# Altium PCB PCB1.PcbDoc (part 3 of 5)
Units mm, origin at the board's own origin, x right, y up, seen from the top; angles counter-clockwise.
Board outline 50 x 70 mm, 6 copper layers (Top Layer, L2, L3, L4, L5, Bottom Layer), stack 1.232 mm thick; 119 components, 75 nets, 612 pads, 243 vias.
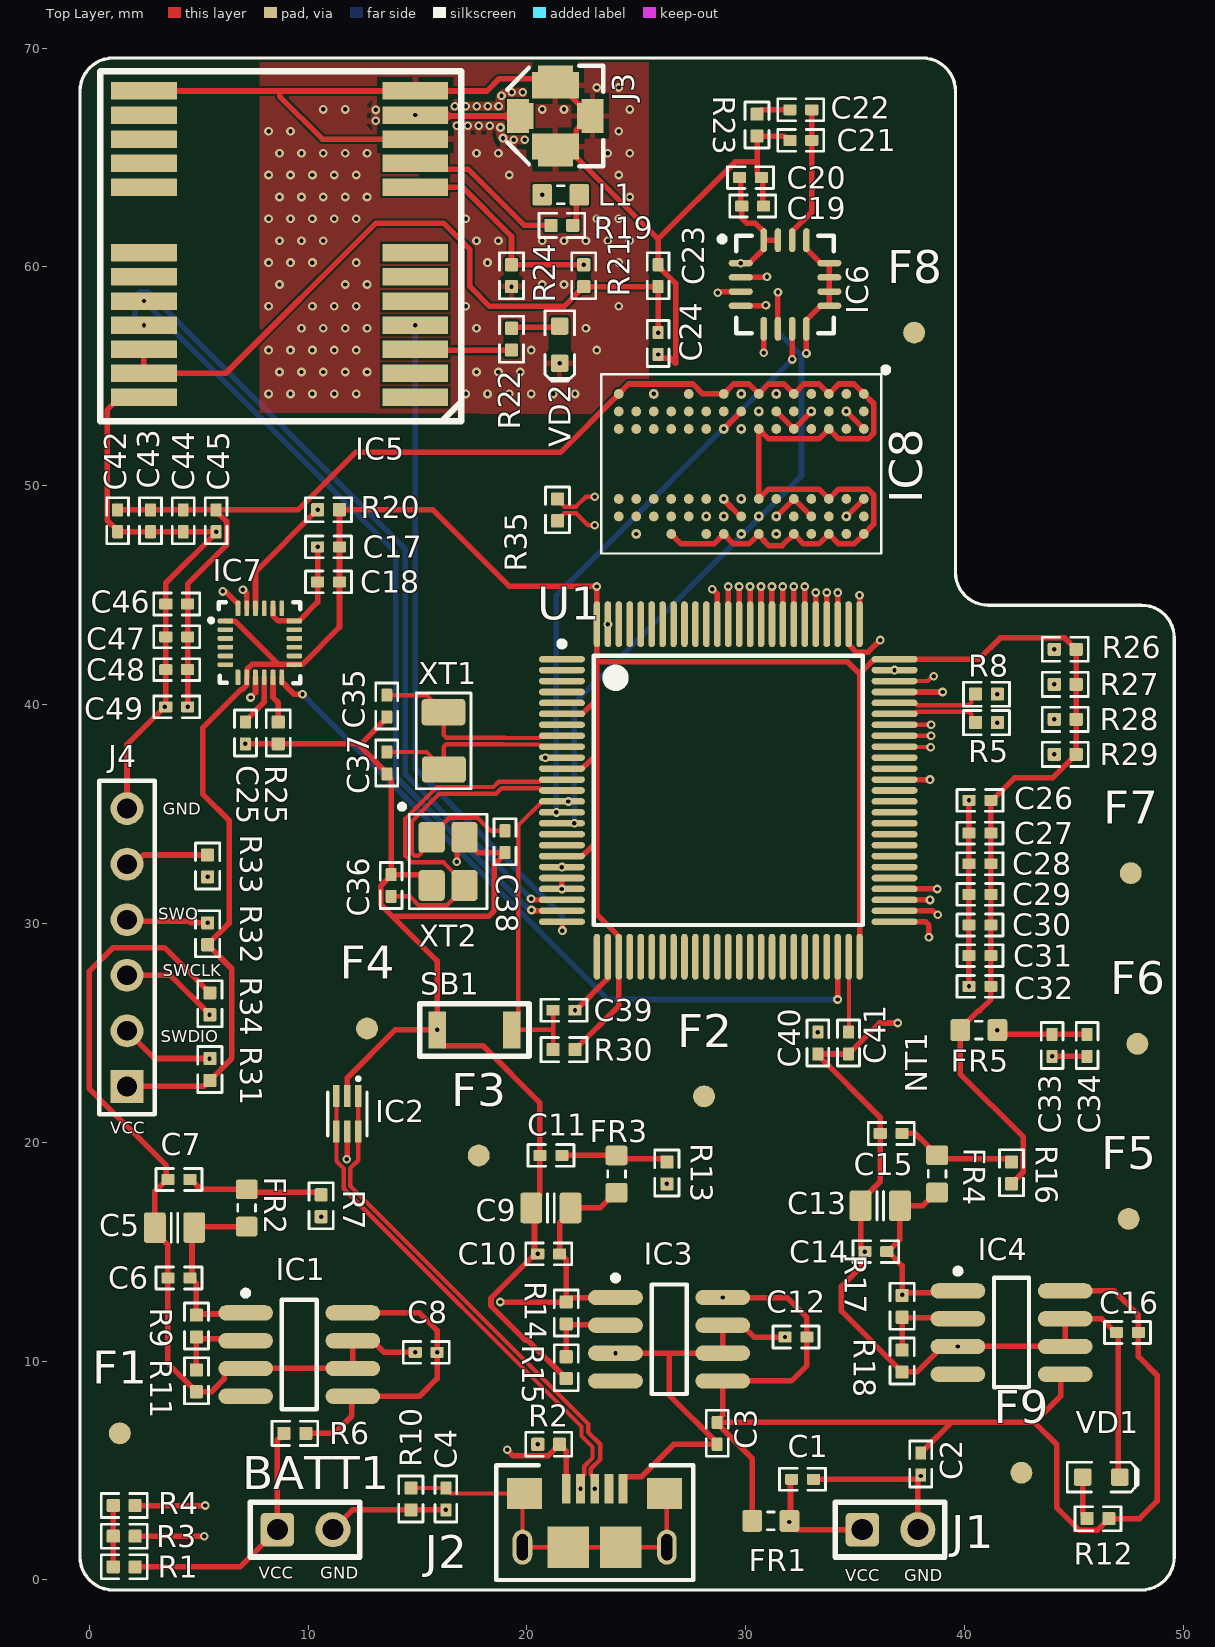
[diagram p0: Top Layer view]

## Part data (continued)
J3: library part RF_IF_connector, "RF COAX CONN, MCX JACK, 50 OHM; Available until stocks are exhausted Alternative available", Frequency=6GHz, Manufacturer=Molex, Manufacturer Lifecycle Status=ACTIVE, Manufacturer Part Number=73412-0114, Max Operating Temperature=90°C, Min Operating Temperature=-40°C, Voltage Rating=60V, Category="RF / Coaxial Connectors", China RoHS=Compliant, ComponentLink1Description=https://datasheet.octopart.com:443/73412-0114-Molex-datasheet-180780342.pdf?src-supplier=IHS, ComponentLink1URL=https://datasheet.octopart.com:443/73412-0114-Molex-datasheet-180780342.pdf?src-supplier=IHS, ComponentLink2Description=https://sigma.octopart.com:443/138898246/technical_drawing/Molex-73412-0114.pdf?src-supplier=Upverter, ComponentLink2URL=https://sigma.octopart.com:443/138898246/technical_drawing/Molex-73412-0114.pdf?src-supplier=Upverter, ComponentLink3Description=https://datasheet.octopart.com:443/73412-0114-Molex-datasheet-138898245.pdf?src-supplier=Upverter, ComponentLink3URL=https://datasheet.octopart.com:443/73412-0114-Molex-datasheet-138898245.pdf?src-supplier=Upverter, ComponentLink4Description=https://datasheet.octopart.com:443/73412-0114-Molex-datasheet-10850749.pdf?src-supplier=Sager+Electronics, ComponentLink4URL=https://datasheet.octopart.com:443/73412-0114-Molex-datasheet-10850749.pdf?src-supplier=Sager+Electronics, ComponentLink5Description=https://datasheet.octopart.com:443/73412-0114-Molex-datasheet-12565081.pdf?src-supplier=Molex, ComponentLink5URL=https://datasheet.octopart.com:443/73412-0114-Molex-datasheet-12565081.pdf?src-supplier=Molex, ComponentLink6Description=https://datasheet.octopart.com:443/73412-0114-Molex-datasheet-10635824.pdf?src-supplier=Molex, ComponentLink6URL=https://datasheet.octopart.com:443/73412-0114-Molex-datasheet-10635824.pdf?src-supplier=Molex, ComponentLink7Description=https://datasheet.octopart.com:443/73412-0114-Molex-datasheet-193131178.pdf?src-supplier=JRH+Electronics, ComponentLink7URL=https://datasheet.octopart.com:443/73412-0114-Molex-datasheet-193131178.pdf?src-supplier=JRH+Electronics, ComponentLink8Description=https://datasheet.octopart.com:443/73412-0114-Molex-datasheet-154758341.pdf?src-supplier=Master+Electronics, ComponentLink8URL=https://datasheet.octopart.com:443/73412-0114-Molex-datasheet-154758341.pdf?src-supplier=Master+Electronics, ComponentLink9Description=https://datasheet.octopart.com:443/73412-0114-Molex-datasheet-48881632.pdf?src-supplier=Electro+Sonic, ComponentLink9URL=https://datasheet.octopart.com:443/73412-0114-Molex-datasheet-48881632.pdf?src-supplier=Electro+Sonic, ComponentLink10Description=https://datasheet.octopart.com:443/73412-0114-Molex-datasheet-140187865.pdf?src-supplier=RS+(Formerly+Allied+Electronics), ComponentLink10URL=https://datasheet.octopart.com:443/73412-0114-Molex-datasheet-140187865.pdf?src-supplier=RS+(Formerly+Allied+Electronics), ComponentLink11Description=https://datasheet.octopart.com:443/73412-0114-Molex-datasheet-120156197.pdf?src-supplier=RS+(Formerly+Allied+Electronics), ComponentLink11URL=https://datasheet.octopart.com:443/73412-0114-Molex-datasheet-120156197.pdf?src-supplier=RS+(Formerly+Allied+Electronics), ComponentLink12Description=https://datasheet.octopart.com:443/73412-0114-Molex-datasheet-34442373.pdf?src-supplier=RS+(Formerly+Allied+Electronics), ComponentLink12URL=https://datasheet.octopart.com:443/73412-0114-Molex-datasheet-34442373.pdf?src-supplier=RS+(Formerly+Allied+Electronics), ComponentLink13Description=https://datasheet.octopart.com:443/73412-0114-Molex-datasheet-101583681.pdf?src-supplier=Newark, ComponentLink13URL=https://datasheet.octopart.com:443/73412-0114-Molex-datasheet-101583681.pdf?src-supplier=Newark, ComponentLink14Description=https://datasheet.octopart.com:443/73412-0114-Molex-datasheet-33004215.pdf?src-supplier=Newark, ComponentLink14URL=https://datasheet.octopart.com:443/73412-0114-Molex-datasheet-33004215.pdf?src-supplier=Newark, ComponentLink15Description=https://datasheet.octopart.com:443/73412-0114-Molex-datasheet-45012700.pdf?src-supplier=TME, ComponentLink15URL=https://datasheet.octopart.com:443/73412-0114-Molex-datasheet-45012700.pdf?src-supplier=TME, ComponentLink16Description=https://datasheet.octopart.com:443/0734120114-Molex-datasheet-11806901.pdf?src-supplier=Arrow+Electronics, ComponentLink16URL=https://datasheet.octopart.com:443/0734120114-Molex-datasheet-11806901.pdf?src-supplier=Arrow+Electronics, ComponentLink17Description=http://sigma.octopart.com:80/16441451/rohs_statement/Molex-73412-0114.pdf?src-supplier=Compliance+Statements, ComponentLink17URL=http://sigma.octopart.com:80/16441451/rohs_statement/Molex-73412-0114.pdf?src-supplier=Compliance+Statements, ComponentLink18Description=http://sigma.octopart.com:80/reach_statement/Molex-company-74.pdf?src-supplier=Compliance+Statements, ComponentLink18URL=http://sigma.octopart.com:80/reach_statement/Molex-company-74.pdf?src-supplier=Compliance+Statements, ComponentLink19Description=http://sigma.octopart.com:80/rohs_statement/Molex-company-73.pdf?src-supplier=Compliance+Statements, ComponentLink19URL=http://sigma.octopart.com:80/rohs_statement/Molex-company-73.pdf?src-supplier=Compliance+Statements, ComponentLink20Description=http://sigma.octopart.com:80/conflict_mineral_statement/Molex-company-72.pdf?src-supplier=Compliance+Statements, ComponentLink20URL=http://sigma.octopart.com:80/conflict_mineral_statement/Molex-company-72.pdf?src-supplier=Compliance+Statements, Connector Type=Coaxial, Contact Material="Gold, Nickel", Contact Plating=Gold, Country of Origin=TW, Fastening Type=Snap, Gender=Female, Halogen Free="Low Halogen", Height=1.36mm, Impedance=50Ω, Lifecycle Status=Production, Mounting Technology="Surface Mount", Number of Contacts=1, Orientation=Straight, Packaging="Cut Tape", Polarity=Standard, Pricing="10=0.677, 100=0.547, 500=0.505, 1000=0.432 (EUR)", Radiation Hardening=No, REACH SVHC=Yes, RoHS=Compliant, Schedule B="8536694010, 8536694010|8536694010|8536694010|8536694010|8536694010|8536694010|8536694010|8536694010|8536694010|8536694010|8536694010|8536694010|8536694010|8536694010|8536694010|8536694010|8536694010|8536694010|8536694010|8536694010|8536694010|8536694010|8536694010|85", Stock=3848, Supplier=Farnell, Supplier Part Number=73412-0114, Termination=Solder, Weight=69.994973mg
J4: library part Header6P, "Pin Header, Board-to-Board, 2.54 mm, 1 Rows, 6 Contacts, Through Hole, FCI BergStik II 68000", Color=-, Current Rating=3A, Flammability Rating="UL94 V-0", Housing Color=Black, Insulation Resistance=5GΩ, Manufacturer="Sullins Connector Solutions", Manufacturer Part Number=68000-406HLF, Manufacturer Part Number 1=GRPB061VWVN-RC, Max Operating Temperature=130°C, Max Voltage Rating (AC)=1.5kV, Min Operating Temperature=-65°C, Supplier Part Number=609-3263-ND, Supplier Part Number 1=S9014E-06-ND, Category="Connectors, Interconnects", China RoHS=Compliant, ComponentLink1Description=https://datasheet.octopart.com:443/68000-406HLF-Areva-datasheet-10088795.pdf?src-supplier=Farnell, ComponentLink1URL=https://datasheet.octopart.com:443/68000-406HLF-Areva-datasheet-10088795.pdf?src-supplier=Farnell, ComponentLink2Description=https://datasheet.octopart.com:443/68000-406HLF-Areva-datasheet-8861575.pdf?src-supplier=Farnell, ComponentLink2URL=https://datasheet.octopart.com:443/68000-406HLF-Areva-datasheet-8861575.pdf?src-supplier=Farnell, ComponentLink3Description=https://datasheet.octopart.com:443/68000-406HLF-Amphenol-Communications-Solutions-datasheet-151206381.pdf?src-supplier=Farnell, ComponentLink3URL=https://datasheet.octopart.com:443/68000-406HLF-Amphenol-Communications-Solutions-datasheet-151206381.pdf?src-supplier=Farnell, ComponentLink4Description=https://datasheet.octopart.com:443/68000-406HLF-Areva-datasheet-8713716.pdf?src-supplier=Farnell, ComponentLink4URL=https://datasheet.octopart.com:443/68000-406HLF-Areva-datasheet-8713716.pdf?src-supplier=Farnell, ComponentLink5Description=https://datasheet.octopart.com:443/68000-406HLF-Areva-datasheet-8449737.pdf?src-supplier=Farnell, ComponentLink5URL=https://datasheet.octopart.com:443/68000-406HLF-Areva-datasheet-8449737.pdf?src-supplier=Farnell, ComponentLink6Description=https://datasheet.octopart.com:443/68000-406HLF-Amphenol-Communications-Solutions-datasheet-41232361.pdf?src-supplier=Newark, ComponentLink6URL=https://datasheet.octopart.com:443/68000-406HLF-Amphenol-Communications-Solutions-datasheet-41232361.pdf?src-supplier=Newark, ComponentLink7Description=https://datasheet.octopart.com:443/68000-406HLF-Amphenol-Communications-Solutions-datasheet-154727322.pdf?src-supplier=Electro+Sonic, ComponentLink7URL=https://datasheet.octopart.com:443/68000-406HLF-Amphenol-Communications-Solutions-datasheet-154727322.pdf?src-supplier=Electro+Sonic, ComponentLink8Description=https://datasheet.octopart.com:443/68000-406HLF-Amphenol-Communications-Solutions-datasheet-168215121.pdf?src-supplier=TME, ComponentLink8URL=https://datasheet.octopart.com:443/68000-406HLF-Amphenol-Communications-Solutions-datasheet-168215121.pdf?src-supplier=TME, ComponentLink9Description=https://datasheet.octopart.com:443/68000-406HLF-Amphenol-Communications-Solutions-datasheet-100449246.pdf?src-supplier=Future+Electronics, ComponentLink9URL=https://datasheet.octopart.com:443/68000-406HLF-Amphenol-Communications-Solutions-datasheet-100449246.pdf?src-supplier=Future+Electronics, ComponentLink10Description=https://datasheet.octopart.com:443/68000-406HLF-Amphenol-Communications-Solutions-datasheet-13703433.pdf?src-supplier=RS+(Formerly+Allied+Electronics), ComponentLink10URL=https://datasheet.octopart.com:443/68000-406HLF-Amphenol-Communications-Solutions-datasheet-13703433.pdf?src-supplier=RS+(Formerly+Allied+Electronics), Connector Type="Header, Unshrouded", Contact Finish=Gold, Contact Finish Thickness=Flash, Contact Gender=Male, Contact Material="Nickel, Tin", Contact Mating Length="0.118\" (3.00mm)", Contact Plating=Tin, Contact Type="Male Pin", Depth=2.41mm, Fastening Type=-, Features=-, Gender=Male, Height=8.7mm, Housing Material=Thermoplastic, Lead Length=2.41mm, Length=15.24mm, Lifecycle Status=Production, Mating Post Length=5.84mm, Mounting Technology="Through Hole", Mounting Type="Through Hole", Number of Contacts=6, Number of Positions=6, Number of Positions Loaded=All, Number of Rows=1, Orientation=Straight, Packaging=Bulk, Pins=6, Pitch="0.050\" (1.27mm)", Pricing="1=0.29, 10=0.247, 100=0.2099, 500=0.18728, 1000=0.17833, 5000=0.15917, 10000=0.15157 (USD)", Radiation Hardening=No, REACH SVHC=Yes, RoHS="RoHS Compliant", Row Spacing=-, Stock=13192, Supplier=DigiKey, Supplier 1=Digi-Key, Terminal Pitch=2.54mm, Termination=Solder, Voltage Rating=1.5kV
L1: library part Inductor, "Inductor RF Chip Wirewound 0.027uH 2% 250MHz 35Q-Factor Ceramic 0.6A 0.22Ohm DCR 0603 T/R", Case/Package=0603, DC Current=600mA, DC Resistance (DCR)=220mΩ, Manufacturer="Yageo Group", Manufacturer Part Number=PE-0603CD270GTT, Max Operating Temperature=125°C, Min Operating Temperature=-40°C, Self Resonant Frequency=2.8GHz, Supplier Part Number=673-PE-0603CD270GTT, Test Frequency=250MHz, Tolerance=2%, Category="Fixed Inductors", ComponentLink1Description=https://datasheet.octopart.com:443/PE-0603CD270GTT-Pulse-datasheet-181143408.pdf?src-supplier=IHS, ComponentLink1URL=https://datasheet.octopart.com:443/PE-0603CD270GTT-Pulse-datasheet-181143408.pdf?src-supplier=IHS, ComponentLink2Description=https://datasheet.octopart.com:443/PE-0603CD270GTT-Pulse-datasheet-138830387.pdf?src-supplier=Master+Electronics, ComponentLink2URL=https://datasheet.octopart.com:443/PE-0603CD270GTT-Pulse-datasheet-138830387.pdf?src-supplier=Master+Electronics, ComponentLink3Description=https://datasheet.octopart.com:443/PE-0603CD270GTT-Pulse-datasheet-134530799.pdf?src-supplier=Sager+Electronics, ComponentLink3URL=https://datasheet.octopart.com:443/PE-0603CD270GTT-Pulse-datasheet-134530799.pdf?src-supplier=Sager+Electronics, ComponentLink4Description=https://datasheet.octopart.com:443/PE-0603CD270GTT-Pulse-datasheet-137333523.pdf?src-supplier=Sager+Electronics, ComponentLink4URL=https://datasheet.octopart.com:443/PE-0603CD270GTT-Pulse-datasheet-137333523.pdf?src-supplier=Sager+Electronics, ComponentLink5Description=https://datasheet.octopart.com:443/PE-0603CD270GTT-Pulse-datasheet-11546668.pdf?src-supplier=_legacy+Avnet, ComponentLink5URL=https://datasheet.octopart.com:443/PE-0603CD270GTT-Pulse-datasheet-11546668.pdf?src-supplier=_legacy+Avnet, ComponentLink6Description=https://datasheet.octopart.com:443/PE-0603CD270GTT-Pulse-datasheet-118874.pdf?src-supplier=Component+Distributors+Inc., ComponentLink6URL=https://datasheet.octopart.com:443/PE-0603CD270GTT-Pulse-datasheet-118874.pdf?src-supplier=Component+Distributors+Inc., Core Material=Ceramic, Depth=1.24mm, Height=1.02mm, Length=1.8mm, Lifecycle Status=Production, Max Current Rating=600mA, Max DC Current=600mA, Military Standard=Not, Number of Circuits=1, Number of Terminals=2, Packaging="Tape & Reel", Pricing="1=0.34, 10=0.276, 50=0.276, 100=0.227, 1000=0.173, 10000=0.165 (USD)", Q Factor=35, Radiation Hardening=No, REACH SVHC=Yes, RoHS=Compliant, Schedule B="8504500000, 8504500000|8504500000, 8504500000|8504500000|8504500000, 8504500000|8504500000|8504500000|8504500000", Shielding=Unshielded, Stock=10862, Supplier=Mouser, Termination=SMD/SMT, Weight=2.012816mg, Width=1.24mm
R1 R2 R3 R4 R6 R7 R13 R16 R24 R25 R33: library part Res, "GENERAL PURPOSE CHIP RESISTOR Metal Glaze/thick Film, 0.0625W, 0ohm, Surface Mount, 0402", Case Code (Imperial)=0402, Manufacturer="Yageo Group", Manufacturer Part Number=RC0402JR-070RL, Max Operating Temperature=155°C, Max Power Dissipation=63mW, Min Operating Temperature=-55°C, Power Rating=62.5mW, Temperature Coefficient=200ppm/°C, Tolerance=5%, Voltage Rating=50V, Case/Package=0402, Category="Chip SMD Resistors", China RoHS=Non-Compliant, ComponentLink1Description=https://datasheet.octopart.com:443/RC0402JR-070RL-Yageo-datasheet-182189538.pdf?src-supplier=IHS, ComponentLink1URL=https://datasheet.octopart.com:443/RC0402JR-070RL-Yageo-datasheet-182189538.pdf?src-supplier=IHS, ComponentLink2Description=https://datasheet.octopart.com:443/RC0402JR-070RL-Yageo-datasheet-10408619.pdf?src-supplier=Newark, ComponentLink2URL=https://datasheet.octopart.com:443/RC0402JR-070RL-Yageo-datasheet-10408619.pdf?src-supplier=Newark, ComponentLink3Description=https://datasheet.octopart.com:443/RC0402JR-070RL-Yageo-Group-datasheet-181964826.pdf?src-supplier=Newark, ComponentLink3URL=https://datasheet.octopart.com:443/RC0402JR-070RL-Yageo-Group-datasheet-181964826.pdf?src-supplier=Newark, ComponentLink4Description=https://datasheet.octopart.com:443/RC0402JR-070RL-Yageo-Group-datasheet-190305687.pdf?src-supplier=Future+Electronics, ComponentLink4URL=https://datasheet.octopart.com:443/RC0402JR-070RL-Yageo-Group-datasheet-190305687.pdf?src-supplier=Future+Electronics, ComponentLink5Description=https://datasheet.octopart.com:443/RC0402JR-070RL-Yageo-datasheet-164759695.pdf?src-supplier=Future+Electronics, ComponentLink5URL=https://datasheet.octopart.com:443/RC0402JR-070RL-Yageo-datasheet-164759695.pdf?src-supplier=Future+Electronics, ComponentLink6Description=https://datasheet.octopart.com:443/RC0402JR-070RL-Yageo-datasheet-137700087.pdf?src-supplier=Future+Electronics, ComponentLink6URL=https://datasheet.octopart.com:443/RC0402JR-070RL-Yageo-datasheet-137700087.pdf?src-supplier=Future+Electronics, ComponentLink7Description=https://datasheet.octopart.com:443/RC0402JR-070RL-Yageo-datasheet-12531192.pdf?src-supplier=Seeed+Studio, ComponentLink7URL=https://datasheet.octopart.com:443/RC0402JR-070RL-Yageo-datasheet-12531192.pdf?src-supplier=Seeed+Studio, ComponentLink8Description=https://datasheet.octopart.com:443/RC0402JR-070RL-Yageo-datasheet-8324527.pdf?src-supplier=TME, ComponentLink8URL=https://datasheet.octopart.com:443/RC0402JR-070RL-Yageo-datasheet-8324527.pdf?src-supplier=TME, ComponentLink9Description=https://datasheet.octopart.com:443/RC0402JR-070RL-Yageo-datasheet-62067350.pdf?src-supplier=Farnell, ComponentLink9URL=https://datasheet.octopart.com:443/RC0402JR-070RL-Yageo-datasheet-62067350.pdf?src-supplier=Farnell, ComponentLink10Description=https://datasheet.octopart.com:443/RC0402JR-070RL-Yageo-datasheet-8329306.pdf?src-supplier=element14, ComponentLink10URL=https://datasheet.octopart.com:443/RC0402JR-070RL-Yageo-datasheet-8329306.pdf?src-supplier=element14, ComponentLink11Description=https://datasheet.octopart.com:443/RC0402JR-070RL-Yageo-datasheet-505231.pdf?src-supplier=element14, ComponentLink11URL=https://datasheet.octopart.com:443/RC0402JR-070RL-Yageo-datasheet-505231.pdf?src-supplier=element14, ComponentLink12Description=https://datasheet.octopart.com:443/RC0402JR-070RL-Yageo-datasheet-175423674.pdf?src-supplier=SOS+electronic, ComponentLink12URL=https://datasheet.octopart.com:443/RC0402JR-070RL-Yageo-datasheet-175423674.pdf?src-supplier=SOS+electronic, ComponentLink13Description=https://datasheet.octopart.com/RC0402JR-070RL-Yageo-datasheet-73766026.pdf, ComponentLink13URL=https://datasheet.octopart.com/RC0402JR-070RL-Yageo-datasheet-73766026.pdf, ComponentLink14Description=http://sigma.octopart.com:80/conflict_mineral_statement/Yageo-company-3.pdf?src-supplier=Compliance+Statements, ComponentLink14URL=http://sigma.octopart.com:80/conflict_mineral_statement/Yageo-company-3.pdf?src-supplier=Compliance+Statements, ComponentLink15Description=http://sigma.octopart.com:80/rohs_statement/Yageo-company-2.pdf?src-supplier=Compliance+Statements, ComponentLink15URL=http://sigma.octopart.com:80/rohs_statement/Yageo-company-2.pdf?src-supplier=Compliance+Statements, Composition="Thick Film", Contact Plating=Tin, Depth=500µm, Features="Moisture Resistant", Height=350µm, Lead Free="Lead Free", Length=1mm, Lifecycle Status=Production, Military Standard=Not, Mounting Technology="Surface Mount", Number of Terminals=2, Number of Terminations=2, Packaging="Tape & Reel", Pins=2, Pricing="10000=0.0011 (USD)", Radiation Hardening=No, REACH SVHC=Yes, RoHS=Compliant, Schedule B="8533290000, 8533290000|8533290000, 8533290000|8533290000|8533290000, 8533290000|8533290000|8533290000|8533290000", Stock=53900000, Supplier="Arrow Electronics", Supplier Part Number=RC0402JR-070RL, Termination=SMD/SMT, Voltage Rating (DC)=50V, Width=500µm
R5 R8: library part Res, "62.5mW Thick Film Resistors 50V ±100ppm/℃ ±5% 22Ω 0402 Chip Resistor - Surface Mount ROHS", Case Code (Imperial)=0402, Manufacturer="Yageo Group", Manufacturer Part Number=RC0402JR-0722RL, Max Operating Temperature=155°C, Max Power Dissipation=63mW, Min Operating Temperature=-55°C, Power Rating=62.5mW, Temperature Coefficient=100ppm/°C, Tolerance=5%, Voltage Rating=50V, Case/Package=0402, Category="Chip SMD Resistors", China RoHS=Non-Compliant, ComponentLink1Description=https://datasheet.octopart.com:443/RC0402JR-0722RL-Yageo-datasheet-175887523.pdf?src-supplier=IHS, ComponentLink1URL=https://datasheet.octopart.com:443/RC0402JR-0722RL-Yageo-datasheet-175887523.pdf?src-supplier=IHS, ComponentLink2Description=https://datasheet.octopart.com:443/RC0402JR-0722RL-Yageo-datasheet-141265859.pdf?src-supplier=Upverter, ComponentLink2URL=https://datasheet.octopart.com:443/RC0402JR-0722RL-Yageo-datasheet-141265859.pdf?src-supplier=Upverter, ComponentLink3Description=https://sigma.octopart.com:443/138820526/technical_drawing/Yageo-RC0402JR-0722RL.pdf?src-supplier=Upverter, ComponentLink3URL=https://sigma.octopart.com:443/138820526/technical_drawing/Yageo-RC0402JR-0722RL.pdf?src-supplier=Upverter, ComponentLink4Description=https://datasheet.octopart.com:443/RC0402JR-0722RL-Yageo-Group-datasheet-190305687.pdf?src-supplier=Future+Electronics, ComponentLink4URL=https://datasheet.octopart.com:443/RC0402JR-0722RL-Yageo-Group-datasheet-190305687.pdf?src-supplier=Future+Electronics, ComponentLink5Description=https://datasheet.octopart.com:443/RC0402JR-0722RL-Yageo-datasheet-164759695.pdf?src-supplier=Future+Electronics, ComponentLink5URL=https://datasheet.octopart.com:443/RC0402JR-0722RL-Yageo-datasheet-164759695.pdf?src-supplier=Future+Electronics, ComponentLink6Description=https://datasheet.octopart.com:443/RC0402JR-0722RL-Yageo-datasheet-137700087.pdf?src-supplier=Future+Electronics, ComponentLink6URL=https://datasheet.octopart.com:443/RC0402JR-0722RL-Yageo-datasheet-137700087.pdf?src-supplier=Future+Electronics, ComponentLink7Description=https://datasheet.octopart.com:443/RC0402JR-0722RL-Yageo-datasheet-12531192.pdf?src-supplier=Future+Electronics, ComponentLink7URL=https://datasheet.octopart.com:443/RC0402JR-0722RL-Yageo-datasheet-12531192.pdf?src-supplier=Future+Electronics, ComponentLink8Description=https://datasheet.octopart.com:443/RC0402JR-0722RL-Yageo-datasheet-505231.pdf?src-supplier=Future+Electronics, ComponentLink8URL=https://datasheet.octopart.com:443/RC0402JR-0722RL-Yageo-datasheet-505231.pdf?src-supplier=Future+Electronics, ComponentLink9Description=https://datasheet.octopart.com:443/RC0402JR-0722RL-Yageo-datasheet-10408619.pdf?src-supplier=Newark, ComponentLink9URL=https://datasheet.octopart.com:443/RC0402JR-0722RL-Yageo-datasheet-10408619.pdf?src-supplier=Newark, ComponentLink10Description=https://datasheet.octopart.com:443/RC0402JR-0722RL-Yageo-datasheet-8324527.pdf?src-supplier=Newark, ComponentLink10URL=https://datasheet.octopart.com:443/RC0402JR-0722RL-Yageo-datasheet-8324527.pdf?src-supplier=Newark, ComponentLink11Description=https://datasheet.octopart.com:443/RC0402JR-0722RL-Yageo-datasheet-62067350.pdf?src-supplier=element14+APAC, ComponentLink11URL=https://datasheet.octopart.com:443/RC0402JR-0722RL-Yageo-datasheet-62067350.pdf?src-supplier=element14+APAC, ComponentLink12Description=https://datasheet.octopart.com/RC0402JR-0722RL-Yageo-datasheet-73766026.pdf, ComponentLink12URL=https://datasheet.octopart.com/RC0402JR-0722RL-Yageo-datasheet-73766026.pdf, ComponentLink13Description=https://datasheet.octopart.com:443/RC0402JR-0722RL-Yageo-datasheet-8329306.pdf?src-supplier=element14, ComponentLink13URL=https://datasheet.octopart.com:443/RC0402JR-0722RL-Yageo-datasheet-8329306.pdf?src-supplier=element14, ComponentLink14Description=http://sigma.octopart.com:80/conflict_mineral_statement/Yageo-company-3.pdf?src-supplier=Compliance+Statements, ComponentLink14URL=http://sigma.octopart.com:80/conflict_mineral_statement/Yageo-company-3.pdf?src-supplier=Compliance+Statements, ComponentLink15Description=http://sigma.octopart.com:80/rohs_statement/Yageo-company-2.pdf?src-supplier=Compliance+Statements, ComponentLink15URL=http://sigma.octopart.com:80/rohs_statement/Yageo-company-2.pdf?src-supplier=Compliance+Statements, Composition="Thick Film", Country of Origin="Mainland China, Taiwan", Depth=500µm, Export Control Classification Number (ECCN) Code=EAR99, Features="Moisture Resistant", Harmonized Tariff Schedule (HTS) Code=8533.21.00.30, Height=350µm, Introduction Date=2008-07-18, Lead Free="Lead Free", Length=1mm, Lifecycle Status=Production, Military Standard=Not, Mounting Technology="Surface Mount", Number of Terminals=2, Number of Terminations=2, Packaging="Tape & Reel", Pins=2, Pricing="10=0.0052, 100=0.0043, 500=0.0032, 2500=0.0021, 5000=0.002 (EUR)", REACH SVHC=Yes, RoHS=Compliant, Schedule B="8533210045, 8533210045|8533210045, 8533210045|8533210045|8533210045, 8533210045|8533210045|8533210045|8533210045", Stock=890, Supplier=Farnell, Supplier Part Number=RC0402JR-0722RL, Termination=SMD/SMT, Voltage Rating (AC)=50V, Voltage Rating (DC)=50V, Width=500µm, Working Voltage=50V
R9: library part Res, "Res Thick Film 0402 4.75K Ohm 1% 0.063W ±100ppm/°C Molded SMD Paper T/R", Case Code (Imperial)=0402, Case Code (Metric)=1005, Manufacturer="Stackpole Electronics", Manufacturer Part Number=RMCF0402FT4K75, Max Operating Temperature=155°C, Max Power Dissipation=63mW, Min Operating Temperature=-55°C, Ratings=AEC-Q200, Temperature Coefficient=100ppm/°C, Tolerance=1%, Voltage Rating=50V, Case/Package=0402, Category="Chip SMD Resistors", China RoHS=Non-Compliant, ComponentLink1Description=https://datasheet.octopart.com:443/RMCF0402FT4K75-Stackpole-Electronics-datasheet-182148065.pdf?src-supplier=IHS, ComponentLink1URL=https://datasheet.octopart.com:443/RMCF0402FT4K75-Stackpole-Electronics-datasheet-182148065.pdf?src-supplier=IHS, ComponentLink2Description=https://datasheet.octopart.com:443/RMCF0402FT4K75-Stackpole-Electronics-datasheet-141193804.pdf?src-supplier=Upverter, ComponentLink2URL=https://datasheet.octopart.com:443/RMCF0402FT4K75-Stackpole-Electronics-datasheet-141193804.pdf?src-supplier=Upverter, ComponentLink3Description=https://datasheet.octopart.com:443/RMCF0402FT4K75-Stackpole-Electronics-datasheet-62091608.pdf?src-supplier=Upverter, ComponentLink3URL=https://datasheet.octopart.com:443/RMCF0402FT4K75-Stackpole-Electronics-datasheet-62091608.pdf?src-supplier=Upverter, ComponentLink4Description=https://datasheet.octopart.com:443/RMCF0402FT4K75-Stackpole-Electronics-datasheet-28504820.pdf?src-supplier=Master+Electronics, ComponentLink4URL=https://datasheet.octopart.com:443/RMCF0402FT4K75-Stackpole-Electronics-datasheet-28504820.pdf?src-supplier=Master+Electronics, ComponentLink5Description=https://datasheet.octopart.com:443/RMCF0402FT4K75-Stackpole-Electronics-datasheet-12534581.pdf?src-supplier=Stackpole+Electronics, ComponentLink5URL=https://datasheet.octopart.com:443/RMCF0402FT4K75-Stackpole-Electronics-datasheet-12534581.pdf?src-supplier=Stackpole+Electronics, ComponentLink6Description=https://datasheet.octopart.com:443/RMCF0402FT4K75-Stackpole-Electronics-datasheet-10788263.pdf?src-supplier=Stackpole+Electronics, ComponentLink6URL=https://datasheet.octopart.com:443/RMCF0402FT4K75-Stackpole-Electronics-datasheet-10788263.pdf?src-supplier=Stackpole+Electronics, ComponentLink7Description=https://datasheet.octopart.com:443/RMCF0402FT4K75-Stackpole-Electronics-datasheet-154799224.pdf?src-supplier=JRH+Electronics, ComponentLink7URL=https://datasheet.octopart.com:443/RMCF0402FT4K75-Stackpole-Electronics-datasheet-154799224.pdf?src-supplier=JRH+Electronics, ComponentLink8Description=https://datasheet.octopart.com:443/RMCF0402FT4K75-Stackpole-Electronics-datasheet-11546843.pdf?src-supplier=Arrow+Electronics, ComponentLink8URL=https://datasheet.octopart.com:443/RMCF0402FT4K75-Stackpole-Electronics-datasheet-11546843.pdf?src-supplier=Arrow+Electronics, ComponentLink9Description=http://sigma.octopart.com:80/15940719/materials_sheet/Stackpole-Electronics-RMCF0402FT4K75.pdf?src-supplier=Compliance+Statements, ComponentLink9URL=http://sigma.octopart.com:80/15940719/materials_sheet/Stackpole-Electronics-RMCF0402FT4K75.pdf?src-supplier=Compliance+Statements, ComponentLink10Description=http://sigma.octopart.com:80/141158211/reach_statement/Stackpole-Electronics-RMCF0402FT4K75.pdf?src-supplier=Compliance+Statements, ComponentLink10URL=http://sigma.octopart.com:80/141158211/reach_statement/Stackpole-Electronics-RMCF0402FT4K75.pdf?src-supplier=Compliance+Statements, ComponentLink11Description=http://sigma.octopart.com:80/141158212/rohs_statement/Stackpole-Electronics-RMCF0402FT4K75.pdf?src-supplier=Compliance+Statements, ComponentLink11URL=http://sigma.octopart.com:80/141158212/rohs_statement/Stackpole-Electronics-RMCF0402FT4K75.pdf?src-supplier=Compliance+Statements, Composition="Thick Film", Contact Plating=Tin, Depth=500µm, Features="Automotive AEC-Q200", Height=300µm, Lead Free="Lead Free", Length=1mm, Lifecycle Status=Production, Military Standard=Not, Mounting Technology="Surface Mount", Number of Terminals=2, Number of Terminations=2, Packaging="Cut Tape (CT)", Power Rating=63mW, Pricing="5=0.0018 (USD)", Radiation Hardening=No, REACH SVHC=Yes, RoHS=Compliant, Schedule B="8533210045, 8533210045|8533210045, 8533210045|8533210045|8533210045, 8533210045|8533210045|8533210045|8533210045", Stock=5, Supplier="Arrow Electronics", Supplier Part Number=RMCF0402FT4K75, Width=500µm, Working Voltage=50V
R10: library part Res, "Res Thick Film 0402 1M Ohm 1% 0.063W(1/16W) ±100ppm/C Pad SMD T/R Automotive AEC-Q200", Case Code (Imperial)=0402, Case Code (Metric)=1005, Manufacturer="Stackpole Electronics", Manufacturer Part Number=RMCF0402FT1M00, Max Operating Temperature=155°C, Max Power Dissipation=63mW, Min Operating Temperature=-55°C, Ratings=AEC-Q200, Temperature Coefficient=100ppm/°C, Tolerance=1%, Voltage Rating=50V, Case/Package=0402, Category="Chip SMD Resistors", China RoHS=Non-Compliant, ComponentLink1Description=https://datasheet.octopart.com:443/RMCF0402FT1M00-Stackpole-Electronics-datasheet-182148065.pdf?src-supplier=IHS, ComponentLink1URL=https://datasheet.octopart.com:443/RMCF0402FT1M00-Stackpole-Electronics-datasheet-182148065.pdf?src-supplier=IHS, ComponentLink2Description=https://datasheet.octopart.com:443/RMCF0402FT1M00-Stackpole-Electronics-datasheet-141193804.pdf?src-supplier=Upverter, ComponentLink2URL=https://datasheet.octopart.com:443/RMCF0402FT1M00-Stackpole-Electronics-datasheet-141193804.pdf?src-supplier=Upverter, ComponentLink3Description=https://datasheet.octopart.com:443/RMCF0402FT1M00-Stackpole-Electronics-datasheet-62091608.pdf?src-supplier=Upverter, ComponentLink3URL=https://datasheet.octopart.com:443/RMCF0402FT1M00-Stackpole-Electronics-datasheet-62091608.pdf?src-supplier=Upverter, ComponentLink4Description=https://datasheet.octopart.com:443/RMCF0402FT1M00-Stackpole-Electronics-datasheet-28504820.pdf?src-supplier=Master+Electronics, ComponentLink4URL=https://datasheet.octopart.com:443/RMCF0402FT1M00-Stackpole-Electronics-datasheet-28504820.pdf?src-supplier=Master+Electronics, ComponentLink5Description=https://datasheet.octopart.com:443/RMCF0402FT1M00-Stackpole-Electronics-datasheet-12534581.pdf?src-supplier=Stackpole+Electronics, ComponentLink5URL=https://datasheet.octopart.com:443/RMCF0402FT1M00-Stackpole-Electronics-datasheet-12534581.pdf?src-supplier=Stackpole+Electronics, ComponentLink6Description=https://datasheet.octopart.com:443/RMCF0402FT1M00-Stackpole-Electronics-datasheet-10788263.pdf?src-supplier=Stackpole+Electronics, ComponentLink6URL=https://datasheet.octopart.com:443/RMCF0402FT1M00-Stackpole-Electronics-datasheet-10788263.pdf?src-supplier=Stackpole+Electronics, ComponentLink7Description=https://datasheet.octopart.com:443/RMCF0402FT1M00-Stackpole-Electronics-datasheet-154799224.pdf?src-supplier=JRH+Electronics, ComponentLink7URL=https://datasheet.octopart.com:443/RMCF0402FT1M00-Stackpole-Electronics-datasheet-154799224.pdf?src-supplier=JRH+Electronics, ComponentLink8Description=https://datasheet.octopart.com:443/RMCF0402FT1M00-Stackpole-Electronics-datasheet-12510902.pdf?src-supplier=Future+Electronics, ComponentLink8URL=https://datasheet.octopart.com:443/RMCF0402FT1M00-Stackpole-Electronics-datasheet-12510902.pdf?src-supplier=Future+Electronics, ComponentLink9Description=http://sigma.octopart.com:80/15940719/materials_sheet/Stackpole-Electronics-RMCF0402FT1M00.pdf?src-supplier=Compliance+Statements, ComponentLink9URL=http://sigma.octopart.com:80/15940719/materials_sheet/Stackpole-Electronics-RMCF0402FT1M00.pdf?src-supplier=Compliance+Statements, ComponentLink10Description=http://sigma.octopart.com:80/141158211/reach_statement/Stackpole-Electronics-RMCF0402FT1M00.pdf?src-supplier=Compliance+Statements, ComponentLink10URL=http://sigma.octopart.com:80/141158211/reach_statement/Stackpole-Electronics-RMCF0402FT1M00.pdf?src-supplier=Compliance+Statements, ComponentLink11Description=http://sigma.octopart.com:80/141158212/rohs_statement/Stackpole-Electronics-RMCF0402FT1M00.pdf?src-supplier=Compliance+Statements, ComponentLink11URL=http://sigma.octopart.com:80/141158212/rohs_statement/Stackpole-Electronics-RMCF0402FT1M00.pdf?src-supplier=Compliance+Statements, Composition="Thick Film", Contact Plating=Tin, Country of Origin="Japan, Mainland China, Taiwan", Depth=500µm, Export Control Classification Number (ECCN) Code=EAR99, Features="Automotive AEC-Q200", Harmonized Tariff Schedule (HTS) Code=8533.21.00.30, Height=300µm, Introduction Date=2011-01-07, Lead Free="Lead Free", Length=1mm, Lifecycle Status=Production, Military Standard=Not, Mounting Technology="Surface Mount", Number of Terminals=2, Number of Terminations=2, Packaging="Cut Tape (CT)", Power Rating=63mW, Pricing="60000=0.0016 (USD)", Radiation Hardening=No, REACH SVHC=Yes, RoHS=Compliant, Schedule B="8533210045, 8533210045|8533210045, 8533210045|8533210045|8533210045, 8533210045|8533210045|8533210045|8533210045", Stock=70000, Supplier="Arrow Electronics", Supplier Part Number=RMCF0402FT1M00, Width=500µm, Working Voltage=50V
R11 R14 R17 R20 R21 R23 R26 R27 R28 R29 R30 R31 R32 R34: library part Res, "Res Thick Film 0402 10K Ohm 1% 0.063W(1/16W) ±100ppm/C Pad SMD T/R Automotive AEC-Q200", Case Code (Imperial)=0402, Case Code (Metric)=1005, Manufacturer="Stackpole Electronics", Manufacturer Part Number=RMCF0402FT10K0, Max Operating Temperature=155°C, Max Power Dissipation=63mW, Min Operating Temperature=-55°C, Ratings=AEC-Q200, Temperature Coefficient=100ppm/°C, Tolerance=1%, Voltage Rating=50V, Case/Package=0402, Category="Chip SMD Resistors", China RoHS=Non-Compliant, ComponentLink1Description=https://datasheet.octopart.com:443/RMCF0402FT10K0-Stackpole-Electronics-datasheet-182148065.pdf?src-supplier=IHS, ComponentLink1URL=https://datasheet.octopart.com:443/RMCF0402FT10K0-Stackpole-Electronics-datasheet-182148065.pdf?src-supplier=IHS, ComponentLink2Description=https://datasheet.octopart.com:443/RMCF0402FT10K0-Stackpole-Electronics-datasheet-141193804.pdf?src-supplier=Upverter, ComponentLink2URL=https://datasheet.octopart.com:443/RMCF0402FT10K0-Stackpole-Electronics-datasheet-141193804.pdf?src-supplier=Upverter, ComponentLink3Description=https://datasheet.octopart.com:443/RMCF0402FT10K0-Stackpole-Electronics-datasheet-62091608.pdf?src-supplier=Upverter, ComponentLink3URL=https://datasheet.octopart.com:443/RMCF0402FT10K0-Stackpole-Electronics-datasheet-62091608.pdf?src-supplier=Upverter, ComponentLink4Description=https://datasheet.octopart.com:443/RMCF0402FT10K0-Stackpole-Electronics-datasheet-28504820.pdf?src-supplier=Upverter, ComponentLink4URL=https://datasheet.octopart.com:443/RMCF0402FT10K0-Stackpole-Electronics-datasheet-28504820.pdf?src-supplier=Upverter, ComponentLink5Description=https://datasheet.octopart.com:443/RMCF0402FT10K0-Stackpole-Electronics-datasheet-12534581.pdf?src-supplier=Stackpole+Electronics, ComponentLink5URL=https://datasheet.octopart.com:443/RMCF0402FT10K0-Stackpole-Electronics-datasheet-12534581.pdf?src-supplier=Stackpole+Electronics, ComponentLink6Description=https://datasheet.octopart.com:443/RMCF0402FT10K0-Stackpole-Electronics-datasheet-10788263.pdf?src-supplier=Stackpole+Electronics, ComponentLink6URL=https://datasheet.octopart.com:443/RMCF0402FT10K0-Stackpole-Electronics-datasheet-10788263.pdf?src-supplier=Stackpole+Electronics, ComponentLink7Description=https://datasheet.octopart.com:443/RMCF0402FT10K0-Stackpole-Electronics-datasheet-155966809.pdf?src-supplier=Electro+Sonic, ComponentLink7URL=https://datasheet.octopart.com:443/RMCF0402FT10K0-Stackpole-Electronics-datasheet-155966809.pdf?src-supplier=Electro+Sonic, ComponentLink8Description=https://datasheet.octopart.com:443/RMCF0402FT10K0-Stackpole-Electronics-datasheet-189104164.pdf?src-supplier=Master+Electronics, ComponentLink8URL=https://datasheet.octopart.com:443/RMCF0402FT10K0-Stackpole-Electronics-datasheet-189104164.pdf?src-supplier=Master+Electronics, ComponentLink9Description=https://datasheet.octopart.com:443/RMCF0402FT10K0-Stackpole-Electronics-datasheet-12510902.pdf?src-supplier=Master+Electronics, ComponentLink9URL=https://datasheet.octopart.com:443/RMCF0402FT10K0-Stackpole-Electronics-datasheet-12510902.pdf?src-supplier=Master+Electronics, ComponentLink10Description=https://datasheet.octopart.com:443/RMCF0402FT10K0-Stackpole-Electronics-datasheet-11546843.pdf?src-supplier=Arrow+Electronics, ComponentLink10URL=https://datasheet.octopart.com:443/RMCF0402FT10K0-Stackpole-Electronics-datasheet-11546843.pdf?src-supplier=Arrow+Electronics, ComponentLink11Description=https://datasheet.octopart.com:443/RMCF0402FT10K0-Stackpole-Electronics-datasheet-11547379.pdf?src-supplier=Future+Electronics, ComponentLink11URL=https://datasheet.octopart.com:443/RMCF0402FT10K0-Stackpole-Electronics-datasheet-11547379.pdf?src-supplier=Future+Electronics, ComponentLink12Description=https://datasheet.octopart.com:443/RMCF0402FT10K0-Stackpole-Electronics-datasheet-8359789.pdf?src-supplier=Future+Electronics, ComponentLink12URL=https://datasheet.octopart.com:443/RMCF0402FT10K0-Stackpole-Electronics-datasheet-8359789.pdf?src-supplier=Future+Electronics, ComponentLink13Description=https://datasheet.octopart.com:443/RMCF0402FT10K0-Stackpole-Electronics-datasheet-8324226.pdf?src-supplier=Future+Electronics, ComponentLink13URL=https://datasheet.octopart.com:443/RMCF0402FT10K0-Stackpole-Electronics-datasheet-8324226.pdf?src-supplier=Future+Electronics, ComponentLink14Description=http://sigma.octopart.com:80/15940719/materials_sheet/Stackpole-Electronics-RMCF0402FT10K0.pdf?src-supplier=Compliance+Statements, ComponentLink14URL=http://sigma.octopart.com:80/15940719/materials_sheet/Stackpole-Electronics-RMCF0402FT10K0.pdf?src-supplier=Compliance+Statements, ComponentLink15Description=http://sigma.octopart.com:80/141158211/reach_statement/Stackpole-Electronics-RMCF0402FT10K0.pdf?src-supplier=Compliance+Statements, ComponentLink15URL=http://sigma.octopart.com:80/141158211/reach_statement/Stackpole-Electronics-RMCF0402FT10K0.pdf?src-supplier=Compliance+Statements, ComponentLink16Description=http://sigma.octopart.com:80/141158212/rohs_statement/Stackpole-Electronics-RMCF0402FT10K0.pdf?src-supplier=Compliance+Statements, ComponentLink16URL=http://sigma.octopart.com:80/141158212/rohs_statement/Stackpole-Electronics-RMCF0402FT10K0.pdf?src-supplier=Compliance+Statements, Composition="Thick Film", Contact Plating=Tin, Country of Origin="Japan, Mainland China, Taiwan", Depth=500µm, Export Control Classification Number (ECCN) Code=EAR99, Features="Automotive AEC-Q200", Harmonized Tariff Schedule (HTS) Code=8533.21.00.30, Height=300µm, Introduction Date=2011-01-07, Lead Free="Lead Free", Length=1mm, Lifecycle Status=Production, Military Standard=Not, Mounting Technology="Surface Mount", Number of Terminals=2, Number of Terminations=2, Packaging="Cut Tape (CT)", Power Rating=63mW, Pricing="60000=0.0016, 100000=0.0015 (USD)", Radiation Hardening=No, REACH SVHC=Yes, RoHS=Compliant, Schedule B="8533210045, 8533210045|8533210045, 8533210045|8533210045|8533210045, 8533210045|8533210045|8533210045|8533210045", Stock=2060000, Supplier="Arrow Electronics", Supplier Part Number=RMCF0402FT10K0, Width=500µm, Working Voltage=50V
R12 R22: library part Res, "Res Thick Film 0402 1K Ohm 1% 0.063W(1/16W) ±100ppm/C Pad SMD Automotive T/R", Case Code (Imperial)=0402, Case Code (Metric)=1005, Manufacturer="Stackpole Electronics", Manufacturer Part Number=RMCF0402FT1K00, Max Operating Temperature=155°C, Max Power Dissipation=63mW, Min Operating Temperature=-55°C, Ratings=AEC-Q200, Temperature Coefficient=100ppm/°C, Tolerance=1%, Voltage Rating=50V, Case/Package=0402, Category="Chip SMD Resistors", China RoHS=Non-Compliant, ComponentLink1Description=https://datasheet.octopart.com:443/RMCF0402FT1K00-Stackpole-Electronics-datasheet-182148065.pdf?src-supplier=IHS, ComponentLink1URL=https://datasheet.octopart.com:443/RMCF0402FT1K00-Stackpole-Electronics-datasheet-182148065.pdf?src-supplier=IHS, ComponentLink2Description=https://datasheet.octopart.com:443/RMCF0402FT1K00-Stackpole-Electronics-datasheet-141193804.pdf?src-supplier=Upverter, ComponentLink2URL=https://datasheet.octopart.com:443/RMCF0402FT1K00-Stackpole-Electronics-datasheet-141193804.pdf?src-supplier=Upverter, ComponentLink3Description=https://datasheet.octopart.com:443/RMCF0402FT1K00-Stackpole-Electronics-datasheet-62091608.pdf?src-supplier=Upverter, ComponentLink3URL=https://datasheet.octopart.com:443/RMCF0402FT1K00-Stackpole-Electronics-datasheet-62091608.pdf?src-supplier=Upverter, ComponentLink4Description=https://datasheet.octopart.com:443/RMCF0402FT1K00-Stackpole-Electronics-datasheet-12534581.pdf?src-supplier=Upverter, ComponentLink4URL=https://datasheet.octopart.com:443/RMCF0402FT1K00-Stackpole-Electronics-datasheet-12534581.pdf?src-supplier=Upverter, ComponentLink5Description=https://datasheet.octopart.com:443/RMCF0402FT1K00-Stackpole-Electronics-datasheet-28504820.pdf?src-supplier=Upverter, ComponentLink5URL=https://datasheet.octopart.com:443/RMCF0402FT1K00-Stackpole-Electronics-datasheet-28504820.pdf?src-supplier=Upverter, ComponentLink6Description=https://datasheet.octopart.com:443/RMCF0402FT1K00-Stackpole-Electronics-datasheet-12510902.pdf?src-supplier=Upverter, ComponentLink6URL=https://datasheet.octopart.com:443/RMCF0402FT1K00-Stackpole-Electronics-datasheet-12510902.pdf?src-supplier=Upverter, ComponentLink7Description=https://datasheet.octopart.com:443/RMCF0402FT1K00-Stackpole-Electronics-datasheet-10788263.pdf?src-supplier=Stackpole+Electronics, ComponentLink7URL=https://datasheet.octopart.com:443/RMCF0402FT1K00-Stackpole-Electronics-datasheet-10788263.pdf?src-supplier=Stackpole+Electronics, ComponentLink8Description=https://datasheet.octopart.com:443/RMCF0402FT1K00-Stackpole-Electronics-datasheet-155966809.pdf?src-supplier=Electro+Sonic, ComponentLink8URL=https://datasheet.octopart.com:443/RMCF0402FT1K00-Stackpole-Electronics-datasheet-155966809.pdf?src-supplier=Electro+Sonic, ComponentLink9Description=https://datasheet.octopart.com:443/RMCF0402FT1K00-Stackpole-Electronics-datasheet-189104164.pdf?src-supplier=Master+Electronics, ComponentLink9URL=https://datasheet.octopart.com:443/RMCF0402FT1K00-Stackpole-Electronics-datasheet-189104164.pdf?src-supplier=Master+Electronics, ComponentLink10Description=https://datasheet.octopart.com:443/RMCF0402FT1K00-Stackpole-Electronics-datasheet-154799224.pdf?src-supplier=Master+Electronics, ComponentLink10URL=https://datasheet.octopart.com:443/RMCF0402FT1K00-Stackpole-Electronics-datasheet-154799224.pdf?src-supplier=Master+Electronics, ComponentLink11Description=https://datasheet.octopart.com:443/RMCF0402FT1K00-Stackpole-Electronics-datasheet-11546843.pdf?src-supplier=Arrow+Electronics, ComponentLink11URL=https://datasheet.octopart.com:443/RMCF0402FT1K00-Stackpole-Electronics-datasheet-11546843.pdf?src-supplier=Arrow+Electronics, ComponentLink12Description=https://datasheet.octopart.com:443/RMCF0402FT1K00-Stackpole-Electronics-datasheet-11547379.pdf?src-supplier=Future+Electronics, ComponentLink12URL=https://datasheet.octopart.com:443/RMCF0402FT1K00-Stackpole-Electronics-datasheet-11547379.pdf?src-supplier=Future+Electronics, ComponentLink13Description=https://datasheet.octopart.com:443/RMCF0402FT1K00-Stackpole-Electronics-datasheet-8359789.pdf?src-supplier=Future+Electronics, ComponentLink13URL=https://datasheet.octopart.com:443/RMCF0402FT1K00-Stackpole-Electronics-datasheet-8359789.pdf?src-supplier=Future+Electronics, ComponentLink14Description=https://datasheet.octopart.com:443/RMCF0402FT1K00-Stackpole-Electronics-datasheet-8324226.pdf?src-supplier=Future+Electronics, ComponentLink14URL=https://datasheet.octopart.com:443/RMCF0402FT1K00-Stackpole-Electronics-datasheet-8324226.pdf?src-supplier=Future+Electronics, ComponentLink15Description=https://datasheet.octopart.com:443/RMCF0402FT1K00-Stackpole-Electronics-datasheet-8088878.pdf?src-supplier=Future+Electronics, ComponentLink15URL=https://datasheet.octopart.com:443/RMCF0402FT1K00-Stackpole-Electronics-datasheet-8088878.pdf?src-supplier=Future+Electronics, ComponentLink16Description=https://datasheet.octopart.com:443/RMCF0402FT1K00-Stackpole-Electronics-datasheet-5313682.pdf?src-supplier=Future+Electronics, ComponentLink16URL=https://datasheet.octopart.com:443/RMCF0402FT1K00-Stackpole-Electronics-datasheet-5313682.pdf?src-supplier=Future+Electronics, ComponentLink17Description=http://sigma.octopart.com:80/15940719/materials_sheet/Stackpole-Electronics-RMCF0402FT1K00.pdf?src-supplier=Compliance+Statements, ComponentLink17URL=http://sigma.octopart.com:80/15940719/materials_sheet/Stackpole-Electronics-RMCF0402FT1K00.pdf?src-supplier=Compliance+Statements, ComponentLink18Description=http://sigma.octopart.com:80/141158211/reach_statement/Stackpole-Electronics-RMCF0402FT1K00.pdf?src-supplier=Compliance+Statements, ComponentLink18URL=http://sigma.octopart.com:80/141158211/reach_statement/Stackpole-Electronics-RMCF0402FT1K00.pdf?src-supplier=Compliance+Statements, ComponentLink19Description=http://sigma.octopart.com:80/141158212/rohs_statement/Stackpole-Electronics-RMCF0402FT1K00.pdf?src-supplier=Compliance+Statements, ComponentLink19URL=http://sigma.octopart.com:80/141158212/rohs_statement/Stackpole-Electronics-RMCF0402FT1K00.pdf?src-supplier=Compliance+Statements, Composition="Thick Film", Contact Plating=Tin, Country of Origin="Japan, Mainland China, Taiwan", Depth=500µm, Export Control Classification Number (ECCN) Code=EAR99, Features="Automotive AEC-Q200", Harmonized Tariff Schedule (HTS) Code=8533.21.00.30, Height=300µm, Introduction Date=2011-01-07, Lead Free="Lead Free", Length=1mm, Lifecycle Status=Production, Military Standard=Not, Mounting Technology="Surface Mount", Number of Terminals=2, Number of Terminations=2, Packaging="Cut Tape (CT)", Pins=2, Power Rating=63mW, Pricing="60000=0.0015 (USD)", Radiation Hardening=No, REACH SVHC=Yes, RoHS=Compliant, Schedule B="8533210045, 8533210045|8533210045, 8533210045|8533210045|8533210045, 8533210045|8533210045|8533210045|8533210045", Stock=520000, Supplier="Arrow Electronics", Supplier Part Number=RMCF0402FT1K00, Width=500µm, Working Voltage=50V